# Altium PCB ESP32-Realy-Switch-var-1.PcbDoc (part 1 of 2)
Units mm, origin at the board's own origin, x right, y up, seen from the top; angles counter-clockwise.
Board outline 120 x 84.82 mm, 2 copper layers (Top Layer, Bottom Layer), stack 1.571 mm thick; 116 components, 78 nets, 409 pads, 288 vias.
Unrouted connection lines stored in the file: 1.
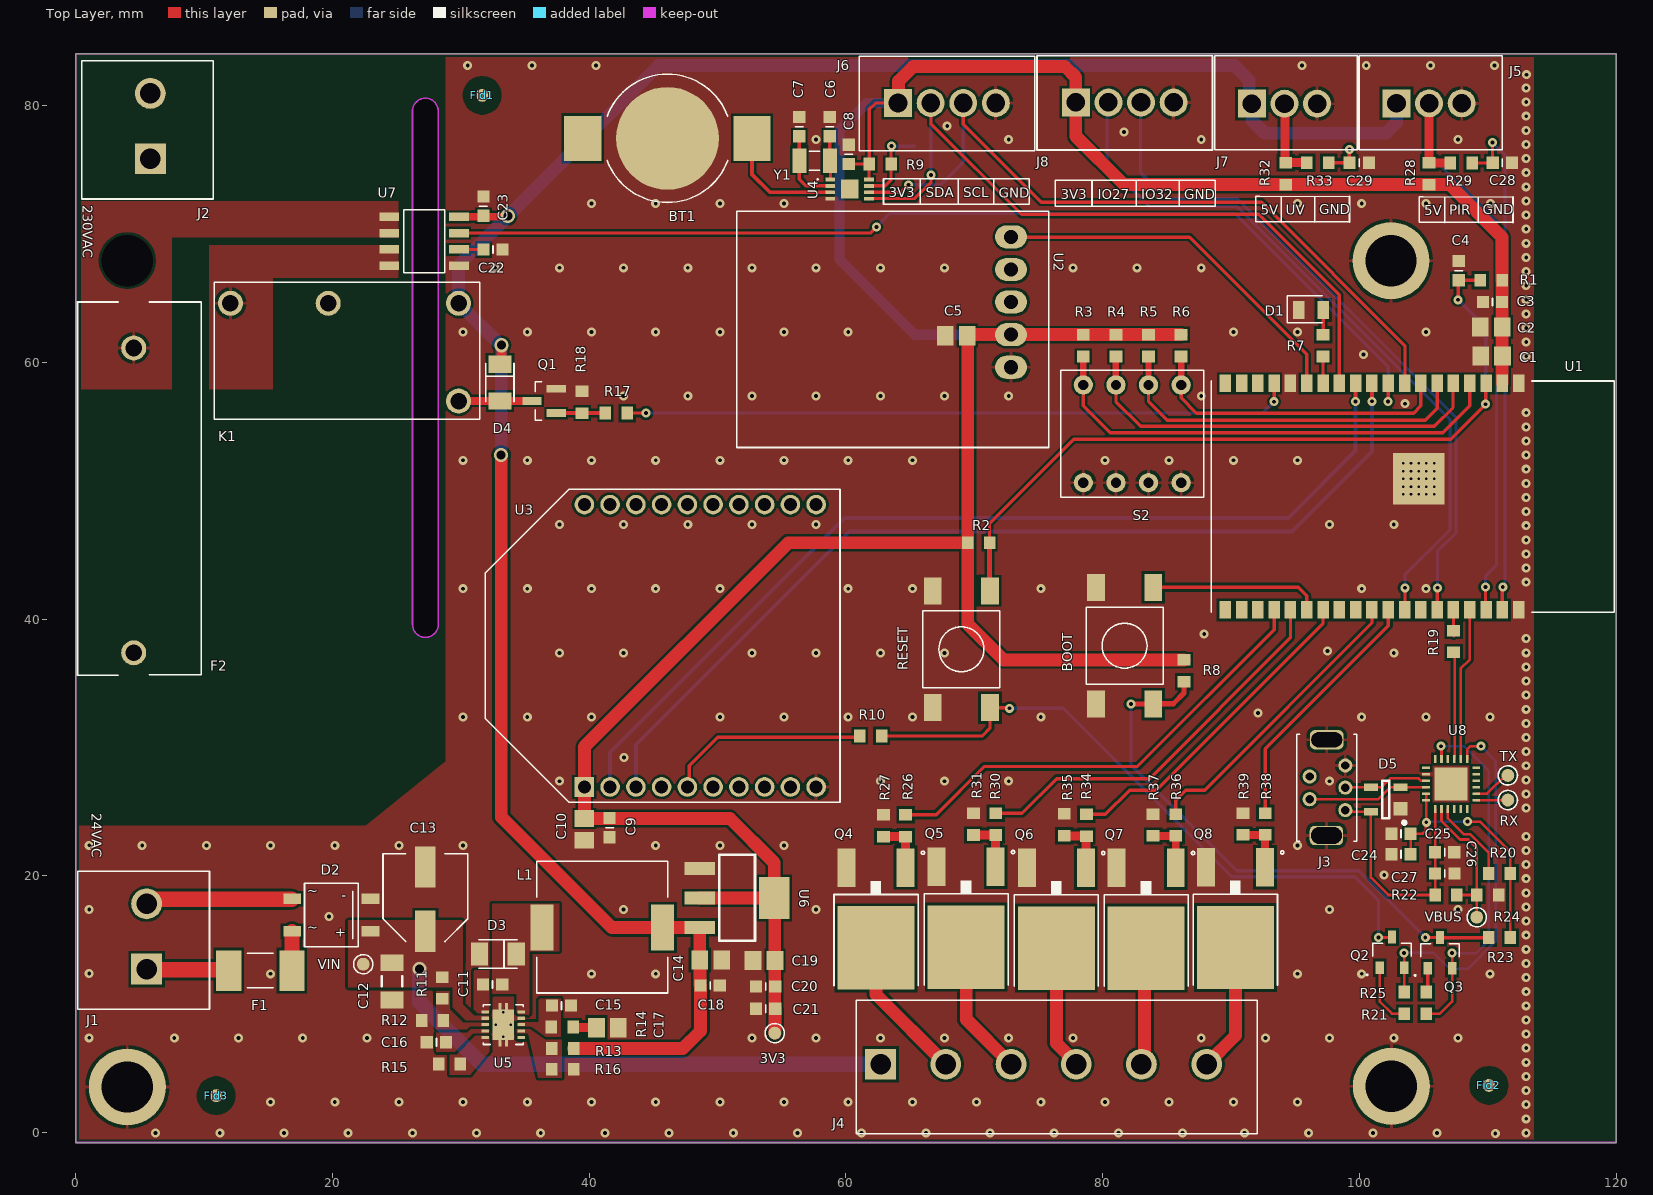
[diagram p0: Top Layer view]
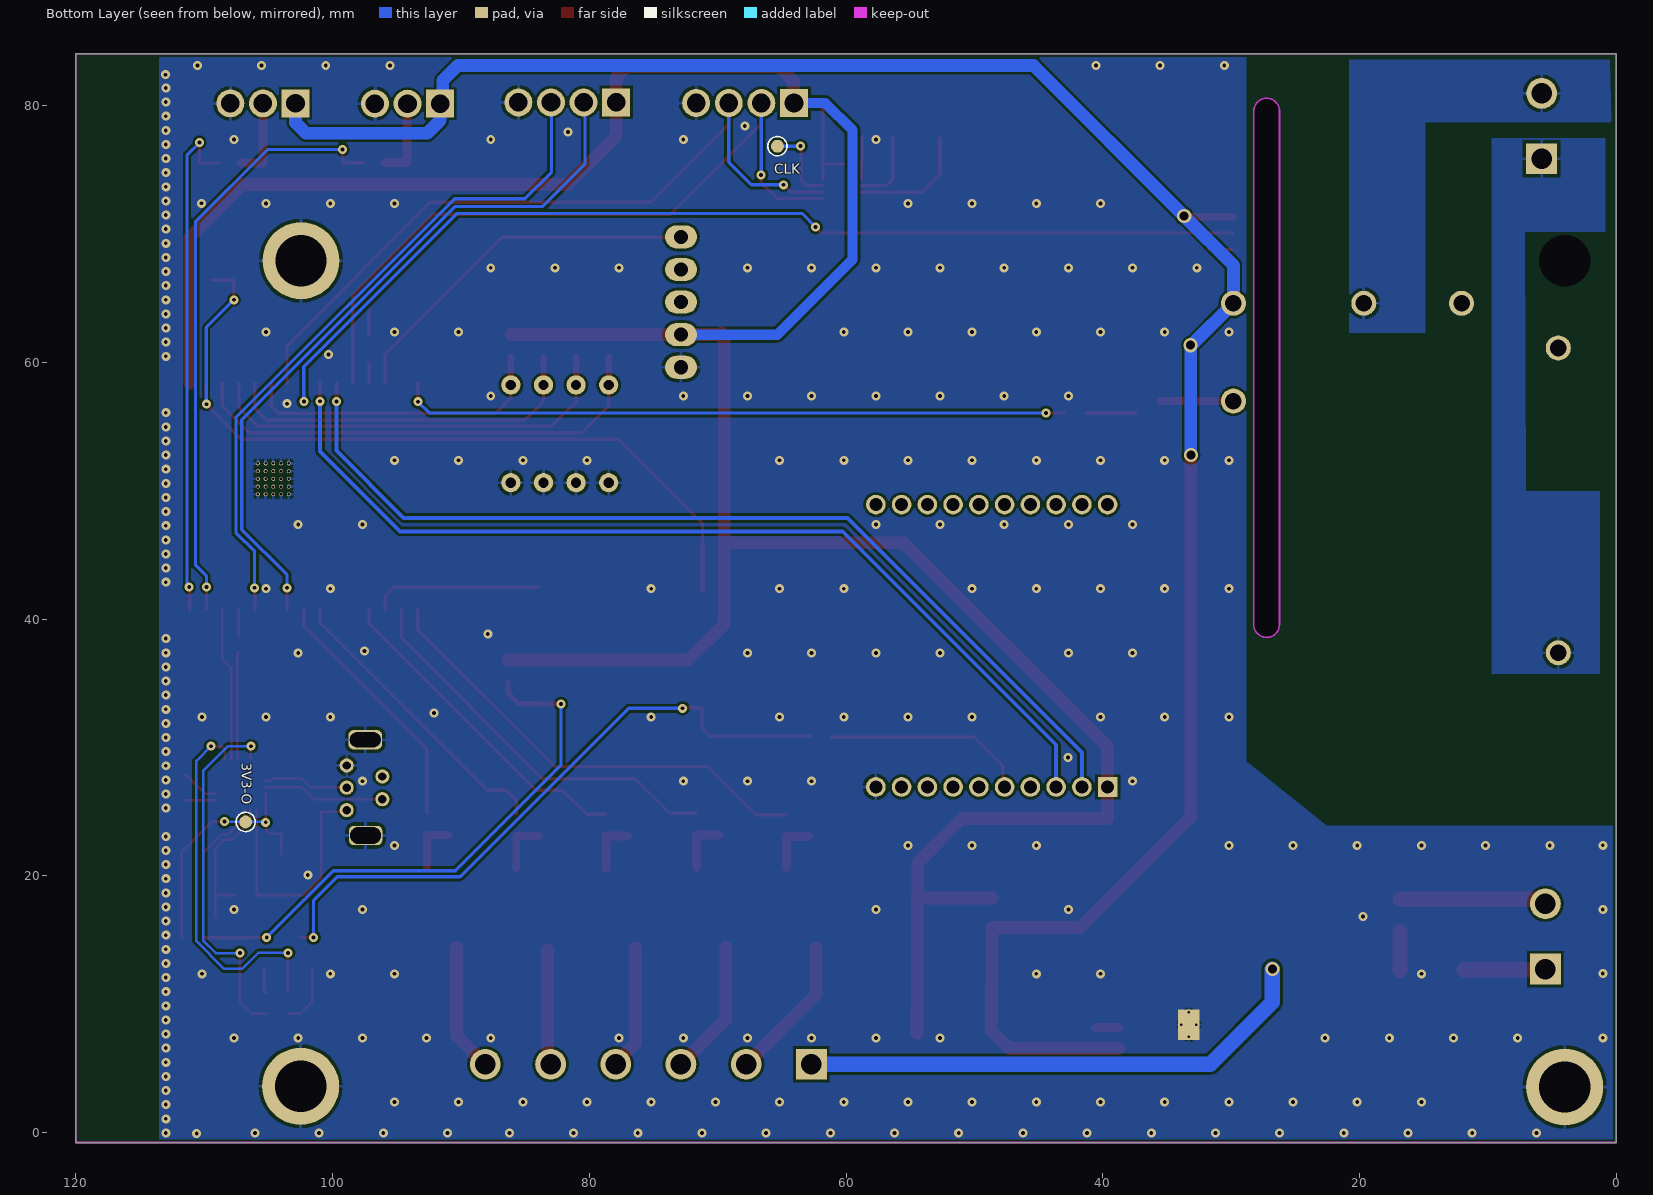
[diagram p1: Bottom Layer view, seen from below]
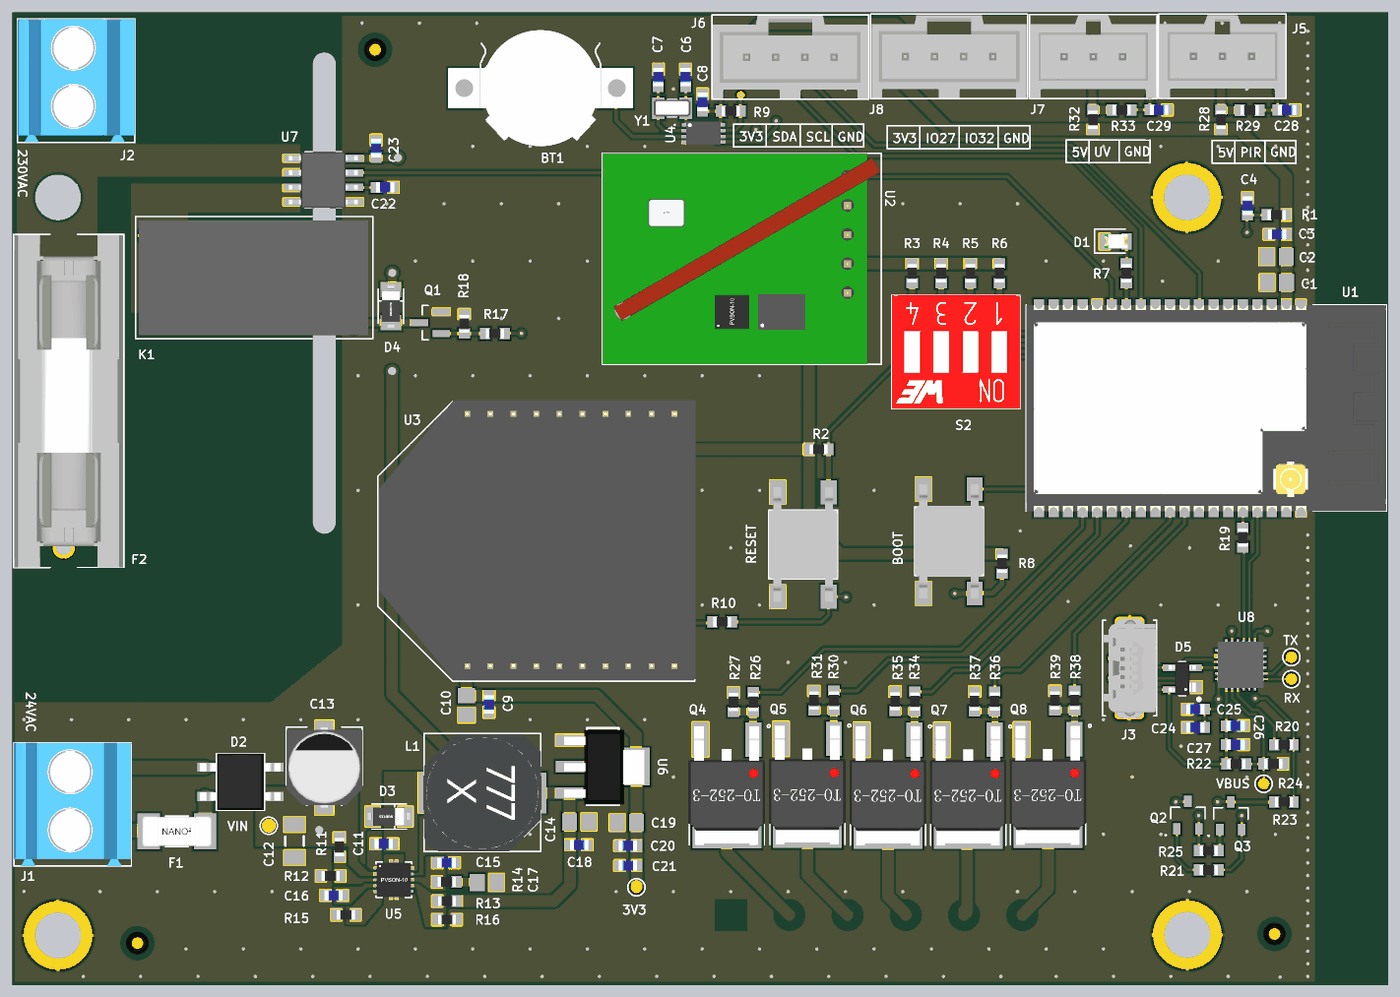
[diagram p2: 3D render of the assembled board from above, using the file's embedded part models]

## Layer stack, top to bottom
Top Solder: solder mask 0.0102, Solder Resist, Dk 3.5
Top Layer: signal copper 0.0356
Dielectric 1: dielectric 1.5, FR-4, Dk 4.8
Bottom Layer: signal copper 0.0356
Bottom Solder: solder mask 0.0102, Solder Resist, Dk 3.5

## Board outline
0.025,-0.775 120.025,-0.775 120.025,84.05 0.025,84.05
cut-out: 26.238,39.6 ccw(c27.244,39.58) 28.25,39.6 28.25,79.6 ccw(c27.244,79.569) 26.238,79.6

## Design rules (kind name [scope] priority, off if disabled: settings)
Clearance [All] p1: gap=0.2 ignorepadtopadclearanceinfootprint=TRUE
Clearance "Stitching GND" [IsStitchingVia and InNet('GND') vs (IsVia and (Not IsStitchingVia)) Or IsPad or IsText or IsWire] p2: gap=0.2 ignorepadtopadclearanceinfootprint=FALSE
Clearance Clearance_excp [InNetClass('230_VAC') vs InNetClass('EXCP')] p3: gap=3.5 ignorepadtopadclearanceinfootprint=TRUE
Clearance Clearance_230VAC [InNetClass('230_VAC') vs not InNetClass('230_VAC')] p4: gap=8 ignorepadtopadclearanceinfootprint=TRUE
DiffPairsRouting DiffPair_diff90DiffPairsRouting [InDifferentialPair ('D') Or InDifferentialPair ('D')] p1: maxlimit=0.4 minlimit=0.1 mostfreqgap=0.1 toplayer_minwidth=0.15 toplayer_maxwidth=0.5 toplayer_prefwidth=0.2 bottomlayer_minwidth=0.15 bottomlayer_maxwidth=0.5 bottomlayer_prefwidth=0.2 maxuncoupledlength=12.7
DiffPairsRouting DiffPair_diff90DiffPairsRouting_1 [InDifferentialPair ('D') Or InDifferentialPair ('D')] p2: maxlimit=0.254 minlimit=0.254 mostfreqgap=0.254 toplayer_minwidth=0.381 toplayer_maxwidth=0.381 toplayer_prefwidth=0.381 bottomlayer_minwidth=0.381 bottomlayer_maxwidth=0.381 bottomlayer_prefwidth=0.381 maxuncoupledlength=12.7
DiffPairsRouting [All] p3: maxlimit=0.254 minlimit=0.254 mostfreqgap=0.254 toplayer_minwidth=0.381 toplayer_maxwidth=0.381 toplayer_prefwidth=0.381 bottomlayer_minwidth=0.381 bottomlayer_maxwidth=0.381 bottomlayer_prefwidth=0.381 maxuncoupledlength=12.7
HoleSize [All] p1: absolutevalues=TRUE maxlimit=10 minlimit=0.025 maxpercent=80.000 minpercent=20.000
MatchedLengths DiffPair_diff90MatchedLengths [InDifferentialPair ('D') Or InDifferentialPair ('D')] p1: tolerance=25.4 checknetsindiffpair=FALSE checkdiffpairvsdiffpair=TRUE checkxsignals=TRUE checkothers=TRUE
MatchedLengths DiffPair_diff90MatchedLengths_1 [InDifferentialPair ('D') Or InDifferentialPair ('D')] p2: tolerance=25.4 checknetsindiffpair=FALSE checkdiffpairvsdiffpair=TRUE checkxsignals=TRUE checkothers=TRUE
MinimumSolderMaskSliver [All] p1: minsoldermaskwidth=0.09
PlaneConnect [All] p1: pad.planeconnectstyle=Relief pad.reliefexpansion=0.508 pad.reliefentries=4 pad.reliefconductorwidth=0.254 pad.reliefairgap=0.254 via.planeconnectstyle=Direct via.reliefexpansion=0.508 via.reliefentries=4 via.reliefconductorwidth=0.254 via.reliefairgap=0.254
PolygonConnect [All] p1: thpad.connectstyle=Relief thpad.reliefconductorwidth=0.254 thpad.reliefentries=4 thpad.polygonreliefangle="90 Angle" thpad.airgapwidth=0.254 smdpad.connectstyle=Direct smdpad.reliefconductorwidth=0.254 smdpad.reliefentries=4 smdpad.polygonreliefangle="90 Angle" smdpad.airgapwidth=0.254 via.connectstyle=Direct via.reliefconductorwidth=0.254 via.reliefentries=4 via.polygonreliefangle="90 Angle" via.airgapwidth=0.254
RoutingVias [All] p1: holewidth=0.3 width=0.7 viastyle="Through Hole" minholewidth=0.3 minwidth=0.7 maxholewidth=0.7 maxwidth=1.2
SilkToSilkClearance [All] p1: silktosilkclearance=0.1
SilkToSolderMaskClearance [IsPad] p1: minsilkscreentomaskgap=0.1 clearancetoexposedcopper=TRUE
SolderMaskExpansion [All] p1: expansion=0.102 istentingtop=FALSE
Width [All] p1: maxlimit=1.2 minlimit=0.2 preferedwidth=0.245
24 further rules are at their usual default settings.

## Classes and differential pairs
differential pair class Diff90: D
net class VBUS_Nets: VBUS
net class TX_Nets: NetTX_1
net class RX_Nets: NetRX_1
net class 3V3-O_Nets: VDD_3V3
net class U8_Nets: D_N D_P DTR GND NetR19_1 NetR20_2 NetRX_1 NetTX_1 NetU8_1 NetU8_10 NetU8_11 NetU8_12 NetU8_13 NetU8_14 NetU8_15 NetU8_16 NetU8_17 NetU8_18 NetU8_22 NetU8_24 RTS TXD0 VBUS VCC-5V VDD_3V3
net class R39_Nets: GND NetQ8_1
net class R38_Nets: NetQ8_1 NetR38_1 TR5
net class R37_Nets: GND NetQ7_1
net class U6_Nets: 3.3V 5V GND
net class R36_Nets: NetQ7_1 TR4
net class Y1_Nets: NetC6_2 NetC7_2
net class U4_Nets: 1HZ_CLK_OUT 3.3V GND I2C_SCL I2C_SDA NetBT1_1 NetC6_2 NetC7_2
net class CLK_Nets: 1HZ_CLK_OUT
net class R32_Nets: 3.3V NetJ7_2
net class C27_Nets: GND VCC-5V
net class C26_Nets: GND VCC-5V
net class C25_Nets: GND VDD_3V3
net class BT1_Nets: GND NetBT1_1
net class D1_Nets: GND NetD1_2
net class R16_Nets: GND NetR13_1 NetU4_6
net class R2_Nets: 3.3V ESP-RESET
net class 3V3_Nets: 3.3V
net class BOOT_Nets: ESP-BOOT GND
net class R34_Nets: NetQ6_1 TR3
net class R33_Nets: NetJ7_2 UV
net class R27_Nets: GND NetQ4_1
net class R28_Nets: 3.3V NetJ5_2
net class R29_Nets: NetJ5_2 PIR
net class R25_Nets: NetQ3_1 RTS
net class R31_Nets: GND NetQ5_1
net class Q8_Nets: GND LED5 NetQ8_1
net class R35_Nets: GND NetQ6_1
net class R17_Nets: NetQ1_1 NetU5_6 RELAY
net class R15_Nets: GND NetR15_2
net class R14_Nets: NetC15_2 NetC17_2
net class R26_Nets: NetQ4_1 TR1
net class R30_Nets: NetQ5_1 TR2
net class C23_Nets: 5V GND NetU9_1 NetU9_3
net class D5_Nets: D_N D_P GND NetU8_1 NetU8_2 NetU8_4 NetU8_5 NetU8_6 NetU8_7 NetU8_8 NetU8_9 NetU8_10 NetU8_11 NetU8_12 NetU8_13 NetU8_14 NetU8_15 NetU8_16 NetU8_17 NetU8_18 NetU8_19 NetU8_21 NetU8_22 NetU8_23 NetU8_24 NetU8_25 NetU8_26 NetU8_27 NetU8_28 VCC-5V
net class J3_Nets: D_N D_P GND NetJ9_1 NetJ9_2 NetJ9_3 NetJ9_4 NetJ9_5 NetJ9_6 VCC-5V
component class USB-PROG: 3V3-O C24 C25 C26 C27 D5 J3 Q2 Q3 R19 R20 R21 R22 R23 R24 R25 RX TX U8 VBUS
net class R24_Nets: GND VBUS
net class R13_Nets: 5V NetQ8_2 NetQ8_3 NetR13_1
net class R12_Nets: GND NetQ7_2 NetQ7_3 NetR11_1
net class Q6_Nets: GND LED3 NetQ6_1 NetQ6_2 NetQ6_3
net class Q5_Nets: GND LED2 NetQ5_1 NetQ5_2 NetQ5_3
component class CONNECTORS: C28 C29 J4 J5 J6 J7 J8 Q4 Q5 Q6 Q7 Q8 R26 R27 R28 R29 R30 R31 R32 R33 R34 R35 R36 R37 R38 R39
net class R11_Nets: NetR11_1 V_IN
net class S2_Nets: GND SW0 SW1 SW2 SW3
net class R8_Nets: 3.3V ESP-BOOT
net class Q7_Nets: GND LED4 NetQ7_1
net class R6_Nets: 3.3V SW0
net class R5_Nets: 3.3V SW1
net class R3_Nets: 3.3V SW3
net class Q4_Nets: GND LED1 NetQ4_1
net class R10_Nets: ESP-RESET NetR10_1
net class R9_Nets: 1HZ_CLK_OUT 3.3V
net class EXCP: 5V GND I-SENSE NetC22_2
net class R22_Nets: VBUS VCC-5V
net class C4_Nets: ESP-RESET GND
net class Q2_Nets: ESP-RESET NetQ2_1 RTS
net class Q1_Nets: GND NetD4_1 NetQ1_1
net class 230_VAC: NetF2_1 NetF2_2 REL-IN REL-OUT
net class J8_Nets: 3.3V Extra_IO1 Extra_IO2 GND
net class VIN_Nets: V_IN
net class R23_Nets: ESP-BOOT VDD_3V3
net class D4_Nets: 5V NetD4_1
net class R20_Nets: NetR20_2 VDD_3V3
net class R21_Nets: DTR NetQ2_1
net class J2_Nets: NetF2_1 REL-OUT
component class RF: B1 B2 B3 B4 BOOT BT1 C1 C2 C3 C4 C5 C6 C7 C8 C9 C10 CLK D1 R1 R2 R3 R4 R5 R6 R7 R8 R9 R10 RESET S2 U1 U2 U3 U4 Y1 é
component class Relay: C22 C23 D4 F2 J2 K1 Q1 R17 R18 U7
component class "Power Supply": 3V3 C11 C12 C13 C14 C15 C16 C17 C18 C19 C20 C21 D2 D3 F1 Fid1 Fid2 Fid3 J1 L1 R11 R12 R13 R14 R15 R16 U5 U6 VIN
net class U1_Nets: 3.3V ESP-BOOT ESP-RESET Extra_IO1 Extra_IO2 GND I2C_SCL I2C_SDA I-SENSE LED MIL_RX NetU4_4 NetU4_5 NetU4_8 NetU4_9 NetU4_16 NetU4_19 NetU4_20 NetU4_21 NetU4_22 NetU4_27 NetU4_28 NetU4_30 NetU4_31 NetU4_32 NetU4_33 NetU4_36 NetU4_37 PIR RELAY RXD0 RXD1 SW0 SW1 SW2 SW3 TR1 TR2 TR3 TR4 TR5 TXD0 TXD1 UV
net class U5_Nets: GND NetC11_1 NetC11_2 NetC15_2 NetC16_2 NetR11_1 NetR13_1 NetR15_2 V_IN
net class U3_Nets: 3.3V GND NetR10_1 NetU2_4 NetU2_6 NetU2_7 NetU2_9 NetU2_11 NetU2_13 NetU2_15 NetU2_17 NetU2_18 NetU2_19 NetU2_20 RXD1 TXD1
net class J6_Nets: 3.3V GND I2C_SCL I2C_SDA NetU1_6
net class R19_Nets: NetR19_1 RXD0
net class R18_Nets: GND NetQ1_1
net class J5_Nets: 5V GND NetJ5_2
net class R1_Nets: 3.3V ESP-RESET
net class C29_Nets: GND UV
net class C22_Nets: GND NetC22_2
net class C24_Nets: GND VDD_3V3
net class R4_Nets: 3.3V SW2
net class C19_Nets: 3.3V GND
net class R7_Nets: LED NetD1_2
net class C11_Nets: NetC11_1 NetC11_2
net class Q3_Nets: DTR ESP-BOOT NetQ3_1
net class C10_Nets: 3.3V GND
net class J4_Nets: LED1 LED2 LED3 LED4 LED5 NetP2_4 V_IN
net class J1_Nets: NetD2_2 NetF1_1
net class L1_Nets: 5V NetC11_2
net class U2_Nets: 3.3V GND MIL_RX
net class K1_Nets: 5V NetD4_1 REL-IN REL-OUT
net class C28_Nets: GND PIR
net class J7_Nets: 5V GND NetJ7_2
net class C17_Nets: GND NetC17_2
net class F2_Nets: NetF2_1 NetF2_2
net class F1_Nets: NetD2_4 NetF1_1
net class C21_Nets: 3.3V GND
net class D3_Nets: GND NetC11_2
net class C5_Nets: 3.3V GND
net class C16_Nets: GND NetC16_2
net class C20_Nets: 3.3V GND
net class RESET_Nets: ESP-RESET GND
net class C13_Nets: GND V_IN
net class C14_Nets: 5V GND
net class C2_Nets: 3.3V GND
net class C6_Nets: GND NetC6_2
net class C18_Nets: 5V GND
net class D2_Nets: GND NetD2_2 NetD2_4 V_IN
net class C15_Nets: GND NetC15_2
net class C1_Nets: 3.3V GND
net class C7_Nets: GND NetC7_2
net class C9_Nets: 3.3V GND
net class C12_Nets: GND V_IN
net class C3_Nets: 3.3V GND
net class C8_Nets: 3.3V GND
net class U7_Nets: 5V GND I-SENSE NetC22_2 NetF2_2 REL-IN
differential pair D: +D_P -D_N

## Components (designator, comment, footprint, x,y, rotation, side; value= is the part's Value field where it differs from the comment)
3V3 "Test Point" TP 54.463,7.746 r270 top
3V3-O "Test Point" TP 106.783,24.197 r180 bottom
BOOT "_" FSM4 81.718,37.925 r0 top (schematic designator S3)
BT1 "Battery" 3050 46.1,77.45 r0 top
C1 "Capacitor" CAPC2012N 110.3,60.5 r180 top
C2 "Capacitor" CAPC2012N 110.275,62.75 r0 top
C3 "Capacitor" CAPC1608N 110.375,64.7 r0 top
C4 "Capacitor" CAPC1608N 107.75,67.15 r270 top
C5 "Capacitor" CAPC2012N 68.601,62.08 r180 top
C6 "Capacitor" CAPC1608N 58.748,78.358 r270 top
C7 "Capacitor" CAPC1608N 56.373,78.358 r270 top
C8 "Capacitor" CAPC1608N 60.225,76.2 r270 top
C9 "Capacitor" CAPC1608N 41.6,23.75 r90 top
C10 "Capacitor" CAPC2012N 39.63,23.62 r90 top
C11 "Capacitor" CAPC1608N 32.479,11.538 r0 top
C12 "Capacitor" CAPC3216N 24.648,11.782 r90 top
C13 "Polarized Capacitor" ECAP_SMD_6.3 27.244,18.182 r90 top
C14 "Capacitor" CAPC2012N 49.475,13.45 r180 top
C15 "Capacitor" CAPC1608N 37.851,9.891 r180 top
C16 "Capacitor" CAPC1608N 28.109,7.036 r0 top
C17 "Capacitor" CAPC2012N 41.425,8.175 r180 top
C18 "Capacitor" CAPC1608N 49.425,11.45 r180 top
C19 "Capacitor" CAPC2012N 53.625,13.4 r0 top
C20 "Capacitor" CAPC1608N 53.75,11.375 r0 top
C21 "Capacitor" CAPC1608N 53.75,9.648 r0 top
C22 "Capacitor" CAPC1608N 32.513,68.798 r180 top
C23 "Capacitor" CAPC1608N 31.762,72.171 r270 top
C24 "Capacitor" CAPC1608N 103.247,21.686 r0 top
C25 "Capacitor" CAPC1608N 103.247,23.283 r0 top
C26 "Capacitor" CAPC1608N 106.652,21.835 r180 top
C27 "Capacitor" CAPC1608N 106.655,20.186 r180 top
C28 "Capacitor" CAPC1608N 111.146,75.55 r180 top
C29 "Capacitor" CAPC1608N 99.995,75.552 r180 top
CLK "Test Point" TP 65.352,76.841 r180 bottom
D1 "150080BS75000" LEDC2012X80N1 96.238,64.075 r0 top
D2 "MB6S-TP" MB6S 22.975,15.675 r180 top
D3 "SS24FL" SOD-123F 32.89,13.914 r180 top
D4 "SS24FL" SOD-123F 33.05,58.425 r270 top
D5 "SP0503BAHTG" SOT192P237X122-4N 102.054,25.943 r180 top
F1 "0452.500NRL" FUSE_NANO2 14.388,12.617 r0 top
F2 "0031.8001" SCHURTER_0031.8201 4.525,49.25 r90 top
Fid1 "Fiducial" FIDUCIAL-1MM 31.675,80.8 r180 top
Fid2 "Fiducial" FIDUCIAL-1MM 110.1,3.675 r270 top
Fid3 "Fiducial" FIDUCIAL-1MM 10.95,2.875 r270 top
J1 "24VAC" CUI_TB007-508-02BE 5.527,12.737 r90 top
J2 "230VAC" CUI_TB007-508-02BE 5.821,75.868 r90 top
J3 "USB MINI B" 502237-0517 98.912,25.118 r90 top
J4 "TB007-508-06BE" HDR1X6 85.316,-7.629 r0 top
J5 "90136-1103" HDR1X3 102.895,80.175 r0 top
J6 "90136-1204" HDR1X4 64.065,80.2 r0 top
J7 "90136-1103" HDR1X3 91.63,80.15 r0 top
J8 "90136-1204" HDR1X4 77.915,80.25 r0 top
K1 "ALQ305" ALQ305 29.835,64.6 r180 top
L1 "MSS1038-223MLB" MSS1038 41.025,15.975 r270 top
Q1 "BC817-40Q-7-F" SOT23-3N 37.442,56.047 r90 top
Q2 "MMSS8050-H-TP" SOT95P245X112-3N 102.543,14.036 r90 top
Q3 "MMSS8050-H-TP" SOT95P245X112-3N 106.282,13.995 r90 top
Q4 "FDD6030L" TO-252-3-TAB 62.35,18.2 r270 top
Q5 "FDD6030L" TO-252-3-TAB 69.375,18.25 r270 top
Q6 "FDD6030L" TO-252-3-TAB 76.4,18.175 r270 top
Q7 "FDD6030L" TO-252-3-TAB 83.4,18.175 r270 top
Q8 "FDD6030L" TO-252-3-TAB 90.35,18.225 r270 top
R1 "Resistor" RESC1608N 110.275,66.4 r180 top
R2 "Resistor" RESC1608N 70.35,45.95 r180 top
R3 "Resistor" RESC1608N 78.5,61.308 r90 top
R4 "Resistor" RESC1608N 81.04,61.308 r90 top
R5 "Resistor" RESC1608N 83.58,61.308 r90 top
R6 "Resistor" RESC1608N 86.12,61.308 r90 top
R7 "Resistor" RESC1608N 97.175,61.308 r90 top
R8 "Resistor" RESC1608N 86.35,35.975 r90 top
R9 "Resistor" RESC1608N 62.675,75.45 r180 top
R10 "Resistor" RESC1608N 61.933,30.894 r0 top
R11 "Resistor" RESC1608N 28.558,11.259 r90 top
R12 "Resistor" RESC1608N 27.799,8.742 r0 top
R13 "Resistor" RESC1608N 37.94,6.542 r0 top
R14 "Resistor" RESC1608N 37.915,8.217 r180 top
R15 "Resistor" RESC1608N 29.127,5.344 r0 top
R16 "Resistor" RESC1608N 37.942,4.932 r180 top
R17 "Resistor" RESC1608N 42.123,56.05 r0 top
R18 "Resistor" RESC1608N 39.45,56.9 r270 top
R19 "Resistor" RESC1608N 107.339,38.254 r90 top
R20 "Resistor" RESC1608N 110.92,20.186 r180 top
R21 "Resistor" RESC1608N 104.365,9.259 r180 top
R22 "Resistor" RESC1608N 106.758,18.504 r180 top
R23 "Resistor" RESC1608N 110.92,15.186 r0 top
R24 "Resistor" RESC1608N 109.997,18.518 r180 top
R25 "Resistor" RESC1608N 104.365,10.938 r0 top
R26 "Resistor" RESC1608N 64.65,23.909 r270 top
R27 "Resistor" RESC1608N 62.925,23.909 r270 top
R28 "Resistor" RESC1608N 105.435,74.7 r270 top
R29 "Resistor" RESC1608N 107.936,75.527 r0 top
R30 "Resistor" RESC1608N 71.675,24.031 r270 top
R31 "Resistor" RESC1608N 69.937,24.031 r270 top
R32 "Resistor" RESC1608N 94.27,74.702 r270 top
R33 "Resistor" RESC1608N 96.77,75.552 r0 top
R34 "Resistor" RESC1608N 78.738,23.949 r270 top
R35 "Resistor" RESC1608N 77.013,23.974 r270 top
R36 "Resistor" RESC1608N 85.7,23.959 r270 top
R37 "Resistor" RESC1608N 83.94,23.959 r270 top
R38 "Resistor" RESC1608N 92.673,24.038 r270 top
R39 "Resistor" RESC1608N 90.948,24.038 r270 top
RESET "_" FSM4 69,37.65 r0 top (schematic designator S1)
RX "Test Point" TP 111.571,25.903 r0 top
S2 "418117270904" 418117270904 82.31,54.435 r180 top
TX "Test Point" TP 111.571,27.825 r270 top
U1 "ESP32-WROVER" ESP32-WROVER 88.455,58.545 r270 top
U2 "PCB-KH01" MILIGHT_RF_MODULE 74.605,71.778 r180 top
U3 "XB3-24Z8UT-J" XB3-24Z8UT-J 45.726,37.921 r90 top
U4 "MCP7940N" DFN-8 60.3,73.5 r0 top
U5 "TPS54140ADRCT" VSON-10 33.307,8.406 r0 top
U6 "TLV1117LV33DCYR" SOT223 48.625,20.576 r180 top
U7 "ACS712ELCTR-20A-T" SOIC127P600X175-8N 24.443,71.339 r0 top
U8 "CP2102N-A02-GQFN24" QFN50P400X400X80-25N-D 107.15,27.153 r0 top
VBUS "Test Point" TP 109.15,16.775 r90 top
VIN "Test Point" TP 22.403,13.116 r270 top
Y1 "XTAL" ECX-31B 57.573,75.708 r0 top

## Footprints (in the part's own frame and the unit in brackets; to place one, negate y for a bottom-side part, rotate by r counter-clockwise, add the part's x,y. Pads: shape width x height; smd on the part's side, far side on the other; paste and mask are expansions set on the pad)
3050 [mm]
  rect 2.9x3.5 smd mask+0.05: 1(-6.6,0) 1(6.6,0)
  round 8 smd mask+0.05: 2(0,0)
  silkscreen extent -4.7,-5 4.7,5, body extent -8.05,-5 8.05,5, height 2.95
502237-0517 [mm]
  round 1.1 hole 0.65: 1(0,0) 2(0.85,2.783) 3(1.75,0) 4(2.625,2.783) 5(3.475,0)
  rrect50% 1.5x2.6 hole 2.4 slot 1.3 at 0 deg: MP1(-1.975,1.475)
  rrect50% 1.5x2.6 hole 2.4 slot 1.2 at 0 deg: MP2(5.484,1.45)
  silkscreen extent -2.43,-0.9 5.93,3.8, body extent -2.43,-0.9 5.92,3.8, height 7.9
418117270904 [mm]
  round 1.5 hole 0.8 mask+0.05: 1(-3.81,3.81) 2(-1.27,3.81) 3(1.27,3.81) 4(3.81,3.81) 5(-3.81,-3.81) 6(-1.27,-3.81) 7(1.27,-3.81) 8(3.81,-3.81)
  silkscreen extent -5.58,-4.95 5.58,4.95, body extent -5.58,-4.95 5.58,4.95, height 6.9
ALQ305 [mm]
  round 1.95 hole 1.3: 1(0,0) 2(10.16,0) 3(17.78,0) 4(0,7.62)
  silkscreen extent -1.65,-1.65 19.05,9.02, body extent -1.24,-1.32 18.76,8.68, height 15.1
CAPC1608N [mm]
  rrect0% 0.95x0.95 smd: 1(-0.75,0) 2(0.75,0)
  silkscreen extent 0,-0.3 0,0.3, body extent -0.85,-0.45 0.75,0.45, height 0.81
CAPC2012N [mm] "Chip Capacitor, Body 2.0x1.3mm, IPC Medium Density"
  rect 1.3x1.5 smd: 1(-0.85,0) 2(0.85,0)
  body extent -1.1,-0.72 1.1,0.72, height 1.1
CAPC3216N [mm] "Chip Capacitor, Body 3.2x1.6mm, IPC Medium Density"
  rect 1.3x1.8 smd: 1(-1.45,0) 2(1.45,0)
  silkscreen extent -0.4,-0.8 0.4,0.8, body extent -1.7,-0.9 1.7,0.9, height 1.35
CUI_TB007-508-02BE [mm]
  rect 2.4x2.4 hole 1.6: 1(0,0)
  round 2.4 hole 1.6: 2(5.08,0)
  silkscreen extent -3.14,-4.9 7.62,5.35, body extent -3.14,-4.9 7.62,5.35, height 14
DFN-8 [mm]
  rect 1.36x1.46 smd mask+0.05: 0(0,0)
  rect 0.75x0.3 smd mask+0.05: 1(-1.5,0.75) 2(-1.5,0.25) 3(-1.5,-0.25) 4(-1.5,-0.75) 5(1.5,-0.75) 6(1.5,-0.25) 7(1.5,0.25) 8(1.5,0.75)
  silkscreen extent -2.54,0.71 -2.46,0.79, body extent -1.5,-0.98 1.54,1.02, height 0.89
ECAP_SMD_6.3 [mm]
  rect 3.2x1.6 smd: 1(-2.5,0) 2(2.5,0)
  silkscreen extent -3.3,-3.3 3.55,3.3, body extent -3.48,-3.3 3.52,3.3, height 3.91
ECX-31B [mm]
  rect 1.1x1.9 smd mask+0.05: 1(-1.194,0) 2(1.194,0)
  silkscreen extent -0.4,-0.75 0.4,0.75, body extent -1.6,-0.74 1.6,0.76, height 0.9
ESP32-WROVER [mm]
  rect 1.35x0.9 smd mask+0.07: 1(0.175,23.96) 2(0.175,22.69) 3(0.175,21.42) 4(0.175,20.15) 5(0.175,18.88) 6(0.175,17.61) 7(0.175,16.34) 8(0.175,15.07) 9(0.175,13.8) 10(0.175,12.53) 11(0.175,11.26) 12(0.175,9.99) 13(0.175,8.72) 14(0.175,7.45) 15(0.175,6.18) 16(0.175,4.91) 17(0.175,3.64) 18(0.175,2.37) 19(0.175,1.1) 20(17.825,1.1) 21(17.825,2.37) 22(17.825,3.64) 23(17.825,4.91) 24(17.825,6.18) 25(17.825,7.45) 26(17.825,8.72) 27(17.825,9.99) 28(17.825,11.26) 29(17.825,12.53) 30(17.825,13.8) 31(17.825,15.07) 32(17.825,16.34) 33(17.825,17.61) 34(17.825,18.88) 35(17.825,20.15) 36(17.825,21.42) 37(17.825,22.69) 38(17.825,23.96)
  round 0.3 hole 0.2 mask+0.07: 39(6.42,14.97) 39(6.42,15.57) 39(6.42,16.17) 39(6.42,16.77) 39(6.42,17.37) 39(7.02,14.97) 39(7.02,15.57) 39(7.02,16.17) 39(7.02,16.77) 39(7.02,17.37) 39(7.62,14.97) 39(7.62,15.57) 39(7.62,16.17) 39(7.62,16.77) 39(7.62,17.37) 39(8.22,14.97) 39(8.22,15.57) 39(8.22,16.17) 39(8.22,16.77) 39(8.22,17.37) 39(8.82,14.97) 39(8.82,15.57) 39(8.82,16.17) 39(8.82,16.77) 39(8.82,17.37)
  rect 4x4 smd mask+0.07: 39(7.62,16.17)
  silkscreen extent 0,0 18,31.4, body extent 0,0 18,31.4, height 3.65
FIDUCIAL-1MM [mm] "1MM FIDUCAL MARKER"
  round 1 smd paste-1 mask+0.5: F1(0,0)
  Top Layer pour cut-out: -1.5,0 -1.386,-0.574 -1.061,-1.061 -0.574,-1.386 0,-1.5 0,-1.5 0.574,-1.386 1.061,-1.061 1.386,-0.574 1.5,0 1.5,0 1.386,0.574 1.061,1.061 0.574,1.386 0,1.5 0,1.5 -0.574,1.386 -1.061,1.061 -1.386,0.574 -1.5,0
FSM4 [mm]
  rect 1.4x2.1 smd mask+0.07: 1(2.23,-4.55) 1(2.23,4.55) 2(-2.23,-4.55) 2(-2.23,4.55)
  silkscreen extent -3,-3 3,3, body extent -3,-5 3,5, height 5.1
FUSE_NANO2 [mm]
  rect 1.96x3.15 smd mask+0.07: 1(-2.455,0) 2(2.455,0)
  silkscreen extent -1,-1.35 1,1.35, body extent -3.05,-1.35 3.05,1.35, height 2.7
HDR1X3 [mm]
  rect 2.175x2.175 / inner round 2.175 / far side rect 2.175x2.175 hole 1.45: 1(0,0)
  round 2.175 hole 1.45: 2(2.54,0) 3(5.08,0)
  silkscreen extent -2.9,-3.6 8.23,3.72, body extent -2.82,-3.56 8.15,3.65, height 10.85
HDR1X4 [mm]
  rect 2.175x2.175 / inner round 2.175 / far side rect 2.175x2.175 hole 1.45: 1(0,0)
  round 2.175 hole 1.45: 2(2.54,0) 3(5.08,0) 4(7.62,0)
  silkscreen extent -3.03,-3.7 10.65,3.65, body extent -2.94,-3.65 10.57,3.56, height 10.95
HDR1X6 [mm]
  rect 2.4x2.4 hole 1.6: 1(-22.606,12.954)
  round 2.4 hole 1.6: 2(-17.526,12.954) 3(-12.446,12.954) 4(-7.366,12.954) 5(-2.286,12.954) 6(2.794,12.954)
  silkscreen extent -24.5,7.55 6.73,17.93, body extent -24.43,7.62 6.65,17.87, height 14
LEDC2012X80N1 [mm]
  rect 0.9x1.4 smd: 1(-0.95,0) 2(0.95,0)
  silkscreen extent -1.85,-1 0.85,1.1, body extent -0.95,-0.6 1.05,0.65, height 0.7
MB6S [mm]
  rect 1.4x0.8 smd mask+0: 1(0,0) 2(6.1,-2.54) 3(0,-2.54) 4(6.1,0)
  silkscreen extent 0.95,-3.74 5.15,1.2, body extent -0.47,-3.75 6.57,1.2, height 2.7
MILIGHT_RF_MODULE [mm]
  oval 2.5x1.8 hole 1.1: 1(1.74,2) 2(1.74,4.54) 3(1.74,7.08) 4(1.74,9.62) 5(1.74,12.16)
  silkscreen extent -1.2,0 23.11,18.42, body extent -1.12,0 23.11,18.41, height 7.55
MSS1038 [mm]
  rect 3.56x1.78 smd mask+0.07: 1(0,-4.7) 2(0,4.7)
  silkscreen extent -5.18,-5.1 5.1,5.1, body extent -5.1,-5.15 5.1,5.15, height 4
QFN50P400X400X80-25N-D [mm]
  rect 0.6x0.2 smd: 1(-1.95,1.25) 2(-1.95,0.75) 3(-1.95,0.25) 4(-1.95,-0.25) 5(-1.95,-0.75) 6(-1.95,-1.25) 13(1.95,-1.25) 14(1.95,-0.75) 15(1.95,-0.25) 16(1.95,0.25) 17(1.95,0.75) 18(1.95,1.25)
  rect 0.2x0.6 smd: 7(-1.25,-1.95) 8(-0.75,-1.95) 9(-0.25,-1.95) 10(0.25,-1.95) 11(0.75,-1.95) 12(1.25,-1.95) 19(1.25,1.95) 20(0.75,1.95) 21(0.25,1.95) 22(-0.25,1.95) 23(-0.75,1.95) 24(-1.25,1.95)
  rect 2.55x2.55 smd: 25(0,0)
  body extent -2.05,-2.05 2.05,2.05, height 0.8
RESC1608N [mm] "Chip Resistor, Body 1.6x0.8mm, IPC Medium Density"
  rect 0.9x1 smd: 1(-0.85,0) 2(0.85,0)
  body extent -0.79,-0.42 0.79,0.43, height 0.5
SCHURTER_0031.8201 [mm]
  round 1.95 hole 1.3: 1(-11.875,0) 2(11.875,0)
  silkscreen extent -13.61,-5.25 15.45,4.38, body extent -13.61,-5.18 15.39,4.32, height 17
SOD-123F [mm]
  rect 1.34x1.8 smd paste-0.025 mask+0.07: 1(1.43,0) 2(-1.43,0)
  silkscreen extent -1.5,-1.1 1.5,1.1, body extent -1.85,-0.8 1.85,0.8, height 1.27
SOIC127P600X175-8N [mm]
  rect 1.525x0.65 smd: 1(0,0) 2(0,-1.27) 3(0,-2.54) 4(0,-3.81) 5(5.424,-3.81) 6(5.424,-2.54) 7(5.424,-1.27) 8(5.424,0)
  silkscreen extent 1.11,-4.36 4.31,0.55, body extent -0.29,-4.35 5.71,0.55, height 1.75
SOT23-3N [mm] "SOT23, 3-Leads, Body 2.9x1.3mm, Pitch 0.95mm, Lead Span 2.5mm, IPC Medium Density"
  rect 0.6x1.5 smd: 1(0,0) 2(0.95,1.9) 3(1.9,0)
  silkscreen extent -0.55,1.15 2.45,1.65, body extent -0.55,0.25 2.45,1.65, height 1.1
SOT95P245X112-3N [mm] "SOT23, 3-Leads, Body 2.92x2.45mm, Pitch 0.95mm, IPC Medium Density"
  rect 1x0.65 smd: 1(-1.2,0.95) 2(-1.2,-0.95) 3(1.2,0)
  silkscreen extent -1.8,-1.5 0.7,1.99, body extent -0.7,-1.52 0.7,1.52, height 1.12
SOT192P237X122-4N [mm]
  rect 1.1x1.05 smd: 1(-1.15,0.735)
  rect 1.1x0.6 smd: 2(-1.15,-0.96) 3(1.15,-0.96) 4(1.15,0.96)
  silkscreen extent -1.58,-1.45 0.28,1.92, body extent -1.18,-1.45 1.18,1.45, height 1.22
SOT223 [mm]
  rect 2.4x1 smd: 1(0,0) 2(0,2.3) 3(0,4.6)
  rect 2.4x3.3 smd: 2(-5.8,2.3)
  silkscreen extent -4.3,-1.05 -1.5,5.65, body extent -6.53,-0.9 0.47,5.6, height 1.86
TO-252-3-TAB [mm]
  rect 3x1.4 smd: 1(-2.44,2.3) 3(-2.44,-2.3)
  rect 6.5x6 smd: 4(3.81,0)
  silkscreen extent -3.73,-3.28 6.76,3.78, body extent -3.59,-3.37 6.76,3.33, height 2.41
TP [mm]
  round 1 smd paste-2 mask+0.1: 1(0,0)
  silkscreen extent -0.75,-0.75 0.75,0.75
VSON-10 [mm]
  rrect20% 0.6x0.24 smd mask+0.07: 1(-1.4,1) 2(-1.4,0.5) 3(-1.4,0) 4(-1.4,-0.5) 5(-1.4,-1) 6(1.4,-1) 7(1.4,-0.5) 8(1.4,0) 9(1.4,0.5) 10(1.4,1)
  round 0.3 hole 0.2 mask+0.07: 11(-0.575,0) 11(0,-0.95) 11(0,0.95) 11(0.575,0)
  rrect5% 0.25x0.34 on Top Paste mask+0.07: 11(-0.25,-1.53) 11(-0.25,1.53) 11(0.25,-1.53) 11(0.25,1.53)
  rrect5% 0.25x3.4 smd paste-5 mask+0.07: 11(-0.25,0) 11(0.25,0)
  rrect5% 1.5x1.06 on Top Paste mask+0.07: 11(0,-0.63) 11(0,0.63)
  rrect5% 1.65x2.4 smd paste-5 mask+0.07: 11(0,0)
  rrect5% 1.65x2.4 smd far side paste-5 mask+0.07: 11(0,0)
  silkscreen extent -1.55,-1.55 1.55,1.55, body extent -1.5,-1.5 1.5,1.5, height 0.9
XB3-24Z8UT-J [mm]
  rect 1.53x1.53 hole 1.02: 1(-10.998,6.096)
  round 1.53 hole 1.02: 2(-10.998,4.089) 3(-10.998,2.083) 4(-10.998,0.076) 5(-10.998,-1.93) 6(-10.998,-3.937) 7(-10.998,-5.944) 8(-10.998,-7.95) 9(-10.998,-9.957) 10(-10.998,-11.963) 11(10.998,-11.963) 12(10.998,-9.957) 13(10.998,-7.95) 14(10.998,-5.944) 15(10.998,-3.937) 16(10.998,-1.93) 17(10.998,0.076) 18(10.998,2.083) 19(10.998,4.089) 20(10.998,6.096)
  silkscreen extent -12.19,-13.82 12.19,13.82, body extent -12.06,-13.91 12.32,13.73, height 8.15

## Part data
3V3 3V3-O CLK RX TX VBUS VIN: library part MIS-000000003, Value 1=_, DES=_, FTP=_, MAN=_, MANREF=_, NOTE=_, Part Number=MIS-000000003, SUP=_, SUPREF=_, TOL=_, Value 2=_
BOOT RESET: library part MIS-000000020, DES=_, FTP=_, MAN=_, MANREF=_, NOTE=_, Part Number=MIS-000000020, SUP=_, SUPREF=_, TOL=_, Value 1=_, Value 2=_
BT1: library part MIS-000000022, "Multicell Battery", Value 1=_, DES="Contacts de piles 10MM SM COIN CELL CLIP", FTP=_, MAN="Keystone Electronics", MANREF=3050, NOTE=_, Part Number=MIS-000000022, SUP=Mouser, SUPREF=534-3050, TOL=_, Value 2=_
C1 C2 C5 C10 C19: library part CAP-000000001, Value 1=10uF, Value 2=6V3, DES="MCTT21X106M6R3CT -  Condensateur céramique multicouche CMS, 10 µF, 6.3 V, 0805 [2012 Metric], ± 20%, X5R, Série MCTT", FTP=0805, MAN=MULTICOMP, MANREF=MCTT21X106M6R3CT, NOTE=_, Part Number=CAP-000000001, SUP=Farnell, SUPREF=1759476, TOL=20%
C3 C4 C8 C18 C20 C23: library part CAP-000000002, Value 1=100nF, Value 2=50V, DES="VJ0603V104ZXAPW1BC -  Condensateur céramique multicouche CMS, 0.1 µF, 50 V, 0603 [1608 Metric], +80%, -20%, Y5V", FTP=0603, MAN=VISHAY, MANREF=VJ0603V104ZXAPW1BC, NOTE=_, Part Number=CAP-000000002, SUP=Farnell, SUPREF=2896408, TOL="+80% -20%"
C6: library part CAP-000000014, Value 1=10pF, Value 2=50V, DES="MULTICOMP  MC0603N100J500CT  CONDENSATEUR MLCC C0G/NP0 10PF 50V 0603", FTP=0603, MAN=MULTICOMP, MANREF=MC0603N100J500CT, NOTE=_, Part Number=CAP-000000014, SUP=Farnell, SUPREF=2320799, TOL=5%
C7: library part CAP-000000015, Value 1=12pF, Value 2=50V, DES="MULTICOMP 	MC0603N120J500CT  Condensateur céramique multicouche CMS, Série MC, 12 pF, ± 5%, C0G / NP0, 50 V, 0603 [1608 Metric]", FTP=0603, MAN=MULTICOMP, MANREF=MC0603N120J500CT, NOTE=_, Part Number=CAP-000000015, SUP=Farnell, SUPREF=1759054, TOL=5%
C9 C11 C25 C27 C28 C29: library part CAP-000000005, Value 1=100nF, Value 2=10V, DES="C0603X104K8RACTU -  Condensateur céramique multicouche CMS, 0.1 µF, 10 V, 0603 [1608 Metric], ± 10%, X7R", FTP=0603, MAN=KEMET, MANREF=C0603X104K8RACTU, NOTE=_, Part Number=CAP-000000005, SUP=Farnell, SUPREF=2904937, TOL=10%
C12: library part CAP-000000009, Value 1=3.3uF, Value 2=100V, DES="C3216X7S2A335M160AB -  Condensateur céramique multicouche CMS, 3.3 µF, 100 V, 1206 [3216 Metric], ± 20%, X7S, C Series TDK", FTP=1206, MAN=TDK, MANREF=C3216X7S2A335M160AB, NOTE=_, Part Number=CAP-000000009, SUP=Farnell, SUPREF=2526280, TOL=20%
C13: library part CAP-000000001, Value 1=100uF, Value 2=35V, DES="PANASONIC ELECTRONIC COMPONENTS  EEEFK1V101XP  CONDENSATEUR ELEC ALU 100UF 35V CMS", FTP="SMD Size D8", MAN=PANASONIC, MANREF=EEEFK1V101XP, NOTE=_, Part Number=CAP-000000001, SUP=Farnell, SUPREF=1850114, TOL=20%
C14: library part CAP-000000004, Value 1=47uF, Value 2=10V, DES="GRM21BR61A476ME15L -  Condensateur céramique multicouche CMS, 47 µF, 10 V, 0805 [2012 Metric], ± 20%, X5R, GRM Series", FTP=0805, MAN=MURATA, MANREF=GRM21BR61A476ME15L, NOTE=_, Part Number=CAP-000000004, SUP=Farnell, SUPREF=2611939, TOL=20%
C15: library part CAP-000000008, Value 1=6.8pF, Value 2=100V, DES="Multilayer Ceramic Capacitors MLCC - SMD/SMT 100V 6.8pF C0G 0603 .1pF Tol", FTP=0603, MAN=AVX, MANREF=06031U6R8BAT2A, NOTE=_, Part Number=CAP-000000008, SUP=Mouser, SUPREF=581-06031U6R8BAT2A, TOL=_
C16: library part CAP-000000006, Value 1=6.8nF, Value 2=50V, DES="C0603X682K5GECAUTO -  Condensateur céramique multicouche CMS, ESD, AEC-Q200, 6800 pF, 50 V, 0603 [1608 Metric], ± 10%", FTP=0603, MAN=KEMET, MANREF=C0603X682K5GECAUTO, NOTE=_, Part Number=CAP-000000006, SUP=Farnell, SUPREF=2760504, TOL=10%
C17: library part CAP-000000007, Value 1=2nF, Value 2=25V, DES="C0805C202J3GACTU -  Condensateur céramique multicouche CMS, 2000 pF, 25 V, 0805 [2012 Metric], ± 5%, C0G / NP0", FTP=0805, MAN=KEMET, MANREF=C0805C202J3GACTU, NOTE=_, Part Number=CAP-000000007, SUP=Farnell, SUPREF=2905236, TOL=5%
C21: library part CAP-000000003, Value 1=10nF, Value 2=50V, DES="06035C103JAT2A -  Condensateur céramique multicouche CMS, 10000 pF, 50 V, 0603 [1608 Metric], ± 5%, X7R", FTP=0603, MAN=MULTICOMP, MANREF=06035C103JAT2A, NOTE=_, Part Number=CAP-000000003, SUP=Farnell, SUPREF=1833871, TOL=5%
C22: library part CAP-000000010, Value 1=1nF, Value 2=50V, DES="MC0603B102K500CT -  Condensateur céramique multicouche CMS, 0603 [1608 Metric], 1000 pF, 50 V, ± 10%, X7R, Série MC", FTP=0603, MAN=MULTICOMP, MANREF=MC0603B102K500CT, NOTE=_, Part Number=CAP-000000010, SUP=Farnell, SUPREF=1759088, TOL=10%
C24 C26: library part CAP-000000047, Value 1=4.7uF, Value 2=16V, DES="Multilayer Ceramic Capacitors MLCC - SMD/SMT 4.7UF 16V 10% 0603", FTP=0603, MAN="Murata Electronics", MANREF=GRM188C71C475KE21D, NOTE=_, Part Number=CAP-000000047, SUP=Mouser, SUPREF=81-GRM188C71C475KE1D, TOL=10%
D1: library part LED-000000002, Value 1="20 mA", Value 2=_, DES="Standard LEDs - SMD WL-SMCW SMDMono TpVw Waterclr 0805 Blue", FTP=_, MAN="Wurth Elektronik", MANREF=150080BS75000, NOTE=_, Part Number=LED-000000002, SUP=Mouser, SUPREF=710-150080BS75000, TOL=_
D2: library part DIB-000000001, Value 1=0.5A, Value 2=600V, DES="Redresseurs en pont .5A 600V", FTP=MBS-1, MAN="Micro Commercial Components (MCC)", MANREF=MB6S-TP, NOTE=_, Part Number=DIB-000000001, SUP=Mouser, SUPREF=833-MB6S-TP, TOL=_
D3 D4: library part DIS-000000002, Value 1=2A, Value 2=40V, DES="Schottky Diodes & Rectifiers 40V, 2A SCHOTTKY", FTP=SOD-123-2, MAN="ON Semiconductor / Fairchild", MANREF=SS24FL, NOTE=_, Part Number=DIS-000000002, SUP=Mouser, SUPREF=512-SS24FL, TOL=_
D5: library part TVS-000000002, Value 1="5.5 V", Value 2="30 pF", DES="ESD Suppressors / TVS Diodes TVS AVAL DIODE SMT", FTP=SOT-143, MAN=Littelfuse, MANREF=SP0503BAHTG, NOTE=_, Part Number=TVS-000000002, SUP=Mouser, SUPREF=576-SP0503BAHTG, TOL=_
F1: library part FUS-000000002, Value 1=500mA, Value 2=32VDC, DES="0452.500NRL -  Fusible / Montage en surface, Série NANO2, 500 mA, 125 VAC, 32 VDC, Temporisé, CMS", FTP=_, MAN=LITTELFUSE, MANREF=0452.500NRL, NOTE=_, Part Number=FUS-000000002, SUP=Farnell, SUPREF=9922326, TOL=_
F2: library part FUS-000000001, Value 1=10A, Value 2=600V, DES="Fuse Holder OG FUSEHOLDER 5X20", FTP=_, MAN=Schurter, MANREF=0031.8001, NOTE=_, Part Number=FUS-000000001, SUP=Mouser, SUPREF=693-0031.8001, TOL=_
Fid1 Fid2 Fid3: library part MIS-000000004, Value 1=1mm, Value 2=_, DES=_, FTP=_, MAN=_, MANREF=_, NOTE=_, Part Number=MIS-000000004, SUP=_, SUPREF=_, TOL=_
J1 J2: library part CON-000000001, Value 1=2pts, Value 2="5.08 mm", DES="Fixed Terminal Blocks Terminal block, screw type, 5.08 , horizontal, 2 poles, CUI Blue, slotted screw, PCB mount", FTP=THT, MAN="CUI Devices", MANREF="TB007-508-02BE /  /  / 39910-0102", NOTE=_, Part Number=CON-000000001, SUP=Mouser, SUPREF=490-TB007-508-02BE, TOL=_
J3: library part CON-000000005, Value 1=_, DES="USB Connectors USB Mini-B Rec Hsg Assy S/T 5Ckt", FTP=THT, MAN=Molex, MANREF=502237-0517, NOTE=_, Part Number=CON-000000005, SUP=Mouser, SUPREF=538-502237-0517, TOL=_, Value 2=_
J4: library part CON-000000007, Value 1=6pts, Value 2=_, DES="Borniers fixes Terminal block, screw type, 5.08 , horizontal, 6 poles, CUI Blue, slotted screw, PCB mount", FTP=THT, MAN="CUI Devices", MANREF=TB007-508-06BE, NOTE=_, Part Number=CON-000000007, SUP=Mouser, SUPREF=490-TB007-508-06BE, TOL=_
J5 J7: library part CON-000000003, Value 1=3pts, Value 2="2,54 mm", DES="Headers & Wire Housings 2.54MM CGRIDIII HDR 3P V SR SHRD TIN", FTP=THT, MAN=Molex, MANREF=90136-1103, NOTE=_, Part Number=CON-000000003, SUP=Mouser, SUPREF=538-90136-1103, TOL=_
J6 J8: library part CON-000000004, Value 1=4pts, Value 2="2,54 mm", DES="Headers & Wire Housings 2.54MM CGRIDIII HDR 4P V SR SHRD AU-E", FTP=THT, MAN=Molex, MANREF=90136-1204, NOTE=_, Part Number=CON-000000004, SUP=Mouser, SUPREF=538-90136-1204, TOL=_
K1: library part SWC-000000003, Value 1="10 A", Value 2="5 VDC", DES="General Purpose Relays LQ Relay", MAN="Panasonic Industrial Devices", MANREF=ALQ305, NOTE=_, Part Number=SWC-000000003, SUP=Mouser, SUPREF=769-ALQ305
L1: library part IND-000000001, Value 1=22uH, Value 2=2.85A, DES="Fixed Inductors MSS1038 SMT Shielded 22 uH 20 % 2.85 A", FTP=_, MAN=Coilcraft, MANREF=MSS1038-223MLB, NOTE=_, Part Number=IND-000000001, SUP=Mouser, SUPREF=994-MSS1038-223MLB, TOL=20%
Q1: library part TRP-000000001, Value 1=0.5A, Value 2=45V, DES="Bipolar Transistors - BJT SS Low Sat Transistor", FTP=SOT-23, MAN="Diodes Incorporated", MANREF=BC817-40Q-7-F, NOTE=_, Part Number=TRP-000000001, SUP=Mouser, SUPREF=621-BC817-40Q-7-F, TOL=_
Q2 Q3: library part TRP-000000003, Value 1="1.5 A", Value 2="5 V", DES="Bipolar Transistors - BJT 625mW, 25V, 1500mA", MAN="Micro Commercial Components (MCC)", MANREF=MMSS8050-H-TP, NOTE=_, Part Number=TRP-000000003, SUP=Mouser, SUPREF=833-MMSS8050-H-TP
Q4 Q5 Q6 Q7 Q8: library part TRM-000000001, Value 1="50 A", Value 2="30 V", DES="MOSFET 30V N-Channel Power Trench", FTP=TO-252-3, MAN="ON Semiconductor / Fairchild", MANREF=FDD6030L, NOTE=_, Part Number=TRM-000000001, SUP=Mouser, SUPREF=512-FDD6030L, TOL=_
R1 R2 R3 R4 R5 R6 R8 R9 R16 R18 R21 R25 R28 R29 R32 R33: library part RES-000000001, Value 1=10K, Value 2=0.1W, DES="YAGEO (PHYCOMP)  RC0603FR-0710KL  RESISTANCE COUCHE EPAISSE 10K 0.1W 1%", FTP=0603, MAN=YAGEO, MANREF=RC0603FR-0710KL, NOTE=_, Part Number=RES-000000001, SUP=Farnell, SUPREF=9238603, TOL=1%
R7: library part RES-000000080, Value 1=330R, Value 2=0.1W, DES="MCMR06X331 JTL -  Résistance à puce CMS, Céramique, 330 ohm, Série MCMR, 75 V, Couche épaisse, 0603 [1608 Metric]", FTP=0603, MAN=MULTICOMP, MANREF="MCMR06X331 JTL", NOTE=_, Part Number=RES-000000080, SUP=Farnell, SUPREF=2073475, TOL=1%
R10: library part RES-000000103, Value 1=0R, Value 2=0.125W, DES="Thin Film Resistors - SMD Zero ohm Jumper", FTP=0603, MAN="Vishay / Beyschlag", MANREF=MCT06030Z0000ZP500, NOTE=_, Part Number=RES-000000103, SUP=Mouser, SUPREF=594-MCT06030Z0000ZP5, TOL=_
R11 R14: library part RES-000000003, Value 1=105K, Value 2=0.1W, DES="ERJ3EKF1053V -  Résistance à puce CMS, Couche épaisse, 105 kohm, Série ERJ3E, 75 V, Couche épaisse", FTP=0603, MAN="PANASONIC ELECTRONIC COMPONENT", MANREF=ERJ3EKF1053V, NOTE=_, Part Number=RES-000000003, SUP=Farnell, SUPREF=2059494, TOL=1%
R12: library part RES-000000002, Value 1=15K4, Value 2=0.1W, DES="MCMR06X1542FTL -  Résistance à puce CMS, Céramique, 15.4 kohm, Série MCMR, 75 V, Couche épaisse, 0603 [1608 Metric]", FTP=0603, MAN=MULTICOMP, MANREF=MCMR06X1542FTL, NOTE=_, Part Number=RES-000000002, SUP=Farnell, SUPREF=2073397, TOL=1%
R13: library part RES-000000005, Value 1=56K2, Value 2=0.1W, DES="MCWR06X5622FTL -  Résistance à puce CMS, 56.2 kohm, MCWR06 Series, 75 V, Couche épaisse, 0603 [1608 Metric], 100 mW", FTP=0603, MAN=MULTICOMP, MANREF=MCWR06X5622FTL, NOTE=_, Part Number=RES-000000005, SUP=Farnell, SUPREF=2694903, TOL=1%
R15: library part RES-000000004, Value 1=182K, Value 2=0.1W, DES="ERJ3EKF1823V -  Résistance à puce CMS, Couche épaisse, 182 kohm, Série ERJ3E, 75 V, Couche épaisse", FTP=0603, MAN="PANASONIC ELECTRONIC COMPONENTS", MANREF=ERJ3EKF1823V, NOTE=_, Part Number=RES-000000004, SUP=Farnell, SUPREF=2059508, TOL=1%
R17 R20 R23 R26 R30 R34 R36 R38: library part RES-000000006, Value 1=1K, Value 2=0.625W, DES="Thin Film Resistors - SMD 1KOhm .063W 50PPM", FTP=0603, MAN="TE Connectivity / Neohm", MANREF=CPF0603F1K0C1, NOTE=_, Part Number=RES-000000006, SUP=Mouser, SUPREF=279-CPF0603F1K0C1, TOL=1%
R19: library part RES-000000016, Value 1=470R, Value 2=0.1W, DES="Thick Film Resistors - SMD 470 OHM 1%", FTP=0603, MAN=YAGEO, MANREF=RC0603FR-10470RL, NOTE=_, Part Number=RES-000000016, SUP=Mouser, SUPREF=603-RC0603FR-10470RL, TOL=1%
R22: library part RES-000000017, Value 1=22.1k, Value 2=0.1W, DES="Thin Film Resistors - SMD 0603 22.1Kohms 25ppm 0.5% AEC-Q200", FTP=0603, MAN=Panasonic, MANREF=ERA-3AED2212V, NOTE=_, Part Number=RES-000000017, SUP=Mouser, SUPREF=667-ERA-3AED2212V, TOL=0.5%
R24: library part RES-000000018, Value 1=47.5k, Value 2=0.1W, DES="Thick Film Resistors - SMD 1/10watt 47.5Kohms 1%", FTP=0603, MAN="Vishay / Dale", MANREF=CRCW060347K5FKEA, NOTE=_, Part Number=RES-000000018, SUP=Mouser, SUPREF=71-CRCW0603-47.5K-E3, TOL=1%
R27 R31 R35 R37 R39: library part RES-000000010, Value 1=1M, Value 2=0.1W, DES="ASC0603-1M0FT5 -  Résistance à puce CMS, Couche épaisse, 1 Mohm, 50 V, Couche épaisse, 0603 [1608 Metric], 100 mW", FTP=0603, MAN=WELWYN, MANREF=ASC0603-1M0FT5, NOTE=_, Part Number=RES-000000010, SUP=Farnell, SUPREF=2078928, TOL=1%
S2: library part SWC-000000004, Value 1=_, DES="Commutateurs DIL/Commutateurs SIL WS-DITV DIP 4p THT 2.54mm Hrztl Box", FTP=_, MAN="Wurth Elektronik", MANREF=418117270904, NOTE="In Stock", Part Number=SWC-000000004, SUP=Mouser, SUPREF=710-418117270904, TOL=_, Value 2=_
U1: library part RFC-000000001, Value 1=_, DES="Modules WiFi / 802.11 SMD Module, ESP32-D0WDQ6, 32Mbits PSRAM, 32Mbits SPI flash, PCB Antenna", FTP=_, MAN="Espressif Systems", MANREF=ESP32-WROVER, NOTE=_, Part Number=RFC-000000001, SUP="ASTONE TECHNOLOGY", SUPREF=ESP32-WROVER, TOL=_, Value 2=_
U2: library part RFC-000000003, Value 1=_, DES="RF Module", FTP=_, MAN=Milight, MANREF=PCB-KH01, NOTE=_, Part Number=RFC-000000003, SUP=Deliled, SUPREF=PCB-KH01, TOL=_, Value 2=_
U3: library part RFC-000000002, Value 1=_, DES="Zigbee Modules (802.15.4) XBee3,2.4 Ghz ZB 3.0, U.FL Ant, TH MT", FTP=_, MAN=DIGI, MANREF=XB3-24Z8UT-J, NOTE=_, Part Number=RFC-000000002, SUP=Mouser, SUPREF=888-XB3-24Z8UT, TOL=_, Value 2=_
U4: library part GIC-000000001, "64 x 8, Serial, I2C Real-Time Clock", Value 1=_, DES="Horloge en temps réel I2C GP RTCC 64B SRAM", FTP=DFN-8, MAN="Microchip Technology", MANREF=MCP7940NT-I/MNY, NOTE=_, Part Number=GIC-000000001, SUP=Mouser, SUPREF=579-MCP7940NT-I/MNY, TOL=_, Value 2=_
U5: library part ICP-000000006, Value 1=_, DES="Switching Voltage Regulators 3.5-42Vin,1.5A SD Converter", FTP=VSON-10, MAN="Texas Instruments", MANREF=TPS54140ADRCT, NOTE=_, Part Number=ICP-000000006, SUP=Mouser, SUPREF=595-TPS54140ADRCT, TOL=_, Value 2=_
U6: library part VRG-000000001, Value 1=3.3V, Value 2=1A, DES="TEXAS INSTRUMENTS  TLV1117LV33DCYR  LDO FIXE 3.3V 1A SOT-223-4", FTP=SOT-223, MAN="Texas Instrument", MANREF=TLV1117LV33DCYR, NOTE=_, Part Number=VRG-000000001, SUP=Mouser, SUPREF=595-TLV1117LV33DCYR, TOL=_
U7: library part SEN-000000001, Value 1=20A, Value 2=5V, DES="ACS712ELCTR-20A-T -  Capteur de courant linéaire, Effet Hall, +/- 20A, SOIC-8", FTP=SOIC-8, MAN="ALLEGRO MICROSYSTEMS", MANREF=ACS712ELCTR-20A-T, NOTE=_, Part Number=SEN-000000001, SUP=Farnell, SUPREF=1329624RL, TOL=_
U8: library part MIS-000000025, Value 1=_, DES="Circuit intégré d'interface USB USBXpress - USB to UART Bridge QFN24", FTP=QFN-24, MAN="SILICON LABS", MANREF=CP2102N-A02-GQFN24, NOTE=_, Part Number=MIS-000000025, SUP=Mouser, SUPREF=634-CP2102NA02GQFN24, TOL=_, Value 2=_
Y1: library part MIS-000000021, "Crystal Oscillator", Value 1=32.768KHZ, Value 2=6pF, DES="Quartz 32.768kHz 6pF 20ppm -40C +85C", FTP=_, MAN=ECS, MANREF=ECS-.327-6-34B-TR, NOTE=_, Part Number=MIS-000000021, SUP=Mouser, SUPREF=520-.327-6-34BT, TOL=_

## Free pads (board coordinates)
  round 6 hole 4: MH(4.025,3.55) MH(102.468,67.924) MH(102.5,3.6)
  round 0 hole 4 unplated: MH(4.025,67.924)

## Via types
v1: diameter 0.7, hole 0.3, Top Layer to Bottom Layer, tented both sides, 283 vias
v2: diameter 1.1, hole 0.7, Top Layer to Bottom Layer, tented both sides, 4 vias
v3: diameter 0.7, hole 0.3, Top Layer to Bottom Layer, 1 vias

## Nets (pads, with @x,y where several pads share a name; then routed paths per layer and width w, separated by ;. In a path a pad name is that pad's centre, name@x,y a point inside that pad or via, vN(x,y) a via of type N, cw(c..) or ccw(c..) an arc to the next point about the centre after c; other vN are vias at no path point)
1HZ_CLK_OUT: CLK.1 R9.1 U4.7 | length 6.4
  Top Layer w0.254: U4.7 63.064,73.75 63.525,74.211 63.525,76.81 v3(63.557,76.841)
  Bottom Layer w0.254: v3(63.557,76.841) CLK.1
3.3V: 3V3.1 C1.1 C2.2 C3.2 C5.1 C8.2 C9.2 C10.2 C19.2 C20.2 C21.2 J6.1 J8.1 R1.1 R2.2 R3.2 R4.2 R5.2 R6.2 R8.2 R9.2 R28.2 R32.2 U1.2 U2.4 U3.1 U4.8 U6.2 | length 243.7
  Top Layer w0.254: C8.2 R9.2 ; U4.8 61.8,75.425 R9.2 ; J6.1 62.309,80.2 61.825,79.716 R9.2
  Top Layer w1: U6.2@48.625,18.276 54.425,18.276 54.425,21.025 50.98,24.47 C10.2 39.63,30.055 55.525,45.95 R2.2 ; 3V3.1 54.481,7.765 54.481,9.629 C21.2 54.463,9.685 54.463,13.4 U6.2@54.463,18.238 ; J6.1 J6.1@64.065,80.233 ; J6.1@64.212,80.38 64.099,80.493 64.099,81.906 65.243,83.05 77.073,83.05 77.915,82.208 J8.1 77.915,77.608 81.671,73.852 107.018,73.852 111.125,69.745 R1.1 111.135,66.39 U1.2@111.135,58.38 ; C5.1@69.717,62.299 69.5,62.082 R2.2 ; C5.1@69.995,62.158 U2.4 R6.2 ; R8.2 72.275,36.825 69.5,39.6 R2.2
  Bottom Layer w0.8: J6.1 61.622,80.2 59.5,78.078 59.5,68.025 65.367,62.158 U2.4
5V: C14.2 C18.2 C23.2 D4.2 J5.1 J7.1 K1.1 L1.2 R13.2 U6.3 U7.8 | length 172
  Top Layer w0.6: U7.8 29.871,71.335 C23.2@31.677,71.335 ; C23.2@31.837,71.346 v2@33.623,71.346
  Top Layer w0.8: D4.2@33.171,59.855 v2(33.171,61.336) ; v2@33.623,71.346 v2(33.666,71.389)
  Top Layer w1: v2(33.15,52.775) 33.15,24.592 41.767,15.975 L1.2 L1.2 U6.3 C14.2 ; R13.2 47.299,6.542 48.675,7.918 C18.2 ; C18.2@48.65,11.5 C14.2@48.65,13.2
  Bottom Layer w1: v2(33.15,52.775) 33.15,61.285 K1.1 29.835,67.558 v2(33.666,71.389) 45.402,83.125 90.25,83.125 91.425,81.95 91.425,80.355 J7.1 91.625,80.145 91.625,78.863 92.638,77.85 102.075,77.85 102.895,78.67 J5.1@102.895,80.175
D_N: D5.2 J3.2 U8.4 | length 9.5
  Top Layer w0.2: J3.2 101.48,25.968 102.42,26.908 102.424,26.903 D5.2 U8.4
D_P: D5.3 J3.3 U8.3 | length 6.7
  Top Layer w0.2: J3.3 98.948,26.903 D5.3 101.729,26.903 102.422,27.596 104.61,27.596 104.803,27.403 U8.3
DTR: Q3.2 R21.1 U8.23 | length 28.2
  Top Layer w0.2: R21.1 106.282,9.259 107.232,10.209 Q3.2 v1(107.232,14) ; v1(106.369,30.098) 106.4,30.066 U8.23
  Bottom Layer w0.2: v1(106.369,30.098) 108.165,30.098 110.075,28.187 110.075,14.941 109.109,13.975 107.257,13.975 v1(107.232,14)
ESP-BOOT: BOOT.1 Q3.3 R8.1 R23.1 U1.25 | length 56.9
  Top Layer w0.254: BOOT.1@83.948,33.375 BOOT.1@83.973,33.4 ; BOOT.1@83.948,42.48 95.255,42.48 95.905,41.83 U1.25 ; v1(105.141,15.2) 106.277,15.2 Q3.3 106.291,15.186 R23.1
  Top Layer w0.4: v1(82.217,33.375) BOOT.1@83.948,33.375 ; BOOT.1@83.973,33.4 85.511,33.4 86.35,34.239 R8.1
  Bottom Layer w0.254: v1(82.217,33.375) 82.217,28.62 90.437,20.399 99.941,20.399 v1(105.141,15.2)
ESP-RESET: C4.2 Q2.3 R1.2 R2.1 R10.2 RESET.1 U1.3 | length 112.3
  Top Layer w0.254: R10.2 70.619,30.894 71.225,31.5 71.225,33.095 71.23,33.1 72.542,33.1 72.547,33.095 72.705,33.095 v1(72.75,33.05) ; RESET.1@71.2,42.23 RESET.1@71.23,42.2 ; R2.1 71.2,47.454 77.746,54 107.107,54 109.857,56.75 U1.3@109.857,58.352 ; v1(101.491,15.2) 102.507,15.2 Q2.3 ; v1(107.7,64.875) 107.7,66.35 C4.2 R1.2
  Top Layer w0.4: RESET.1@71.2,42.23 R2.1
  Bottom Layer w0.254: v1(72.75,33.05) 76.95,33.05 90.075,19.925 99.65,19.925 101.491,18.084 v1(101.491,15.2) ; v1(107.7,64.875) 109.857,62.718 v1@109.857,56.75
  other v1: 109.841,56.741
Extra_IO1: J8.3 U1.33 | length 53.5
  Top Layer w0.254: U1.33 106.065,42.417 v1(106.086,42.439)
  Bottom Layer w0.254: J8.3 82.95,80.205 82.95,74.827 85.034,72.743 90.502,72.743 107.541,55.704 107.541,46.741 106.086,45.286 v1(106.086,42.439)
Extra_IO2: J8.2 U1.31 | length 56.1
  Top Layer w0.254: U1.31 103.552,40.747 v1(103.552,42.439)
  Bottom Layer w0.254: J8.2 80.35,80.145 80.35,75.422 83.624,72.148 90.452,72.148 107.087,55.513 107.087,46.974 103.552,43.439 v1(103.552,42.439)
GND: BOOT.2 BT1.2 C1.2 C2.1 C3.1 C4.1 C5.2 C6.1 C7.1 C8.1 C9.1 C10.1 C12.1 C13.2 C14.1 C15.1 C16.1 C17.1 C18.1 C19.1 C20.1 C21.1 C22.1 C23.1 C24.1 C25.1 C26.1 C27.1 C28.1 C29.1 D1.1 D2.3 D3.1 D5.1 J3.5 J3.MP1 J3.MP2 J5.3 J6.4 J7.3 J8.4 pad.MH@4.025,3.55 pad.MH@102.5,3.6 pad.MH@102.468,67.924 Q1.3 Q4.3 Q5.3 Q6.3 Q7.3 Q8.3 R12.1 R15.1 R16.1 R18.1 R24.1 R27.1 R31.1 R35.1 R37.1 R39.1 RESET.2 S2.1 S2.2 S2.3 S2.4 U1.1 U1.15 U1.38 U1.39 U2.5 U3.10 U4.4 U5.9 U5.11@32.732,8.406 U5.11@33.057,8.406 U5.11@33.307,7.456 U5.11@33.307,8.406 U5.11@33.307,9.356 U5.11@33.557,8.406 U5.11@33.882,8.406 U6.1 U7.5 U8.2 U8.25
  other v1: 110.594,-0.082 6.233,-0.025 11.233,-0.025 16.233,-0.025 21.233,-0.025 26.233,-0.025 31.233,-0.025 36.233,-0.025 41.233,-0.025 46.233,-0.025 51.233,-0.025 56.233,-0.025 61.233,-0.025 66.233,-0.025 71.233,-0.025 76.233,-0.025 81.233,-0.025 86.233,-0.025 91.059,-0.025 96.059,-0.025 101.059,-0.025 106.059,-0.025 113,-0.025 113,1.075 113,2.175 15.187,2.369 20.187,2.369 25.187,2.369 30.187,2.369 35.187,2.369 40.187,2.369 45.187,2.369 50.187,2.369 55.187,2.369 60.187,2.369 65.187,2.369 70.187,2.369 75.187,2.369 80.187,2.369 85.187,2.369 90.187,2.369 95.187,2.369 113,3.275 113,4.375 113,5.475 113,6.575 7.687,7.369 12.687,7.369 17.687,7.369 22.687,7.369 52.687,7.369 57.687,7.369 62.687,7.369 67.687,7.369 72.687,7.369 77.687,7.369 87.687,7.369 92.687,7.369 97.687,7.369 102.687,7.369 107.687,7.369 1.058,7.381 113,7.675 113,8.775 113,9.875 113,10.975 113,12.075 15.187,12.369 40.187,12.369 45.187,12.369 95.187,12.369 100.187,12.369 110.187,12.369 1.058,12.381 113,13.175 113,14.275 113,15.375 113,16.475 19.742,16.842 42.687,17.369 57.687,17.369 97.687,17.369 107.687,17.369 1.058,17.381 113,17.575 113,18.675 113,19.775 101.941,20.061 113,20.875 113,21.975 1.058,22.381 5.187,22.369 10.187,22.369 15.187,22.369 20.187,22.369 25.187,22.369 30.187,22.369 45.187,22.369 50.187,22.369 55.187,22.369 95.187,22.369 113,23.075 113,25.275 113,26.375 37.687,27.369 62.687,27.369 67.687,27.369 72.687,27.369 97.687,27.369 113,27.475 113,28.575 42.715,29.221 113,29.675 113,30.775 113,31.875 30.187,32.369 35.187,32.369 40.187,32.369 50.187,32.369 55.187,32.369 60.187,32.369 65.187,32.369 75.187,32.369 100.187,32.369 105.187,32.369 110.187,32.369 92.102,32.681 113,32.975 113,34.075 113,35.175 113,36.275 37.687,37.369 42.687,37.369 52.687,37.369 57.687,37.369 62.687,37.369 67.687,37.369 102.687,37.369 113,37.375 97.53,37.526 113,38.475 87.918,38.832 30.187,42.369 35.187,42.369 40.187,42.369 45.187,42.369 50.187,42.369 60.187,42.369 65.187,42.369 75.187,42.369 100.187,42.369 105.187,42.369 113,42.875 113,43.975 113,45.075 113,46.175 113,47.275 37.687,47.369 42.687,47.369 47.687,47.369 52.687,47.369 57.687,47.369 97.687,47.369 102.687,47.369 113,48.375 113,49.475 113,50.575 113,51.675 30.187,52.369 35.187,52.369 40.187,52.369 45.187,52.369 50.187,52.369 55.187,52.369 60.187,52.369 65.187,52.369 80.187,52.369 85.187,52.369 90.187,52.369 95.187,52.369 113,52.775 113,53.875 113,54.975 113,56.075 103.558,56.777 42.687,57.369 47.687,57.369 52.687,57.369 57.687,57.369 62.687,57.369 67.687,57.369 72.687,57.369 87.687,57.369 113,60.475 100.328,60.611 113,61.575 30.187,62.369 35.187,62.369 40.187,62.369 45.187,62.369 50.187,62.369 55.187,62.369 60.187,62.369 90.187,62.369 95.187,62.369 105.187,62.369 113,62.675 113,63.775 113,64.875 113,65.975 113,67.075 32.687,67.369 37.687,67.369 42.687,67.369 47.687,67.369 52.687,67.369 57.687,67.369 62.687,67.369 67.687,67.369 77.687,67.369 82.687,67.369 87.687,67.369 113,68.175 113,69.275 113,70.375 113,71.475 40.187,72.369 45.187,72.369 50.187,72.369 55.187,72.369 95.187,72.369 100.187,72.369 105.187,72.369 110.21,72.391 113,72.575 113,73.675 113,74.775 113,75.875 113,76.975 57.687,77.369 72.687,77.369 87.687,77.369 107.687,77.369 81.672,77.949 113,78.075 67.896,78.422 113,79.175 113,80.275 113,81.375 113.011,82.406 30.541,83.125 35.541,83.125 40.541,83.125 95.541,83.125 100.541,83.125 105.541,83.125 110.541,83.125
I2C_SCL: J6.3 U1.8 U4.6 | length 59.1
  Top Layer w0.254: U4.6 64.286,73.25 v1(64.871,73.835) ; J6.3 69.145,78.551 75.221,72.475 92.385,72.475 103.552,61.308 U1.8@103.552,58.37
  Bottom Layer w0.254: v1(64.871,73.835) 67.377,73.835 69.145,75.603 J6.3
I2C_SDA: J6.2 U1.12 U4.5 | length 57.4
  Top Layer w0.254: U4.5 61.823,72.773 65.381,72.773 66.641,74.033 v1(66.641,74.59) ; J6.2 66.629,80.176 66.629,78.587 73.684,71.531 92.169,71.531 98.445,65.255 U1.12
  Bottom Layer w0.254: J6.2 66.623,80.182 66.623,74.608 v1(66.641,74.59)
I-SENSE: U1.9 U7.7 | length 83.5
  Top Layer w0.254: U7.7 61.908,70.069 v1(62.375,70.535) ; v1@102.255,56.934 U1.9 v1@102.255,56.934
  Bottom Layer w0.254: v1(62.375,70.535) 63.44,71.6 90.297,71.6 102.247,59.65 v1(102.247,56.957)
LED: R7.1 U1.13 | length 1.6
  Top Layer w0.254: U1.13 97.175,59.975
LED1: J4.2 Q4.4 | length 11.3
  Top Layer w1: Q4.4 62.35,10.765 J4.2
LED2: J4.3 Q5.4 | length 10.6
  Top Layer w1: Q5.4 69.375,8.82 J4.3
LED3: J4.4 Q6.4 | length 9.7
  Top Layer w1: Q6.4 76.4,6.957 77.95,5.407 J4.4
LED4: J4.5 Q7.4 | length 9.6
  Top Layer w0.2: J4.5 J4.5@83.278,5.573 ; Q7.4@83.278,14.243 Q7.4
  Top Layer w1: J4.5 J4.5@83.03,5.704 ; J4.5@83.278,5.573 Q7.4@83.278,14.243
LED5: J4.6 Q8.4 | length 10
  Top Layer w1: J4.6 90.35,7.565 Q8.4
MIL_RX: U1.14 U2.1 | length 43.3
  Top Layer w0.254: U1.14 95.905,60.626 86.781,69.75 ; 86.781,69.75 72.701,69.75 86.781,69.75
NetBT1_1: BT1.1 U4.3 | length 9.5
  Top Layer w0.3: BT1.1@52.7,77.45 52.7,74.633 54.083,73.25 U4.3
NetC6_2: C6.2 U4.1 Y1.2 | length 3.4
  Top Layer w0.254: C6.2 58.748,75.727 Y1.2 58.8,75.675 U4.1
NetC7_2: C7.2 U4.2 Y1.1 | length 9.3
  Top Layer w0.254: U4.2 56.891,73.75 56.373,74.268 ; 56.373,74.268 C7.2 56.373,74.268
NetC11_1: C11.1 U5.1
NetC11_2: C11.2 D3.2 L1.1 U5.10
NetC15_2: C15.2 R14.2 U5.8
NetC16_2: C16.2 U5.4
NetC17_2: C17.2 R14.1 | length 1.8
  Top Layer w0.7: R14.1@38.787,8.196 C17.2@40.554,8.196
NetC22_2: C22.2 U7.6 | length 1.9